# Altium PCB EDP_PCB.PcbDoc
Units mil, origin at the board's own origin, x right, y up, seen from the top; angles counter-clockwise.
Board outline 2905 x 1425 mil, 2 copper layers (Top Layer, Bottom Layer); 16 components, 12 nets, 93 pads, 13 vias.
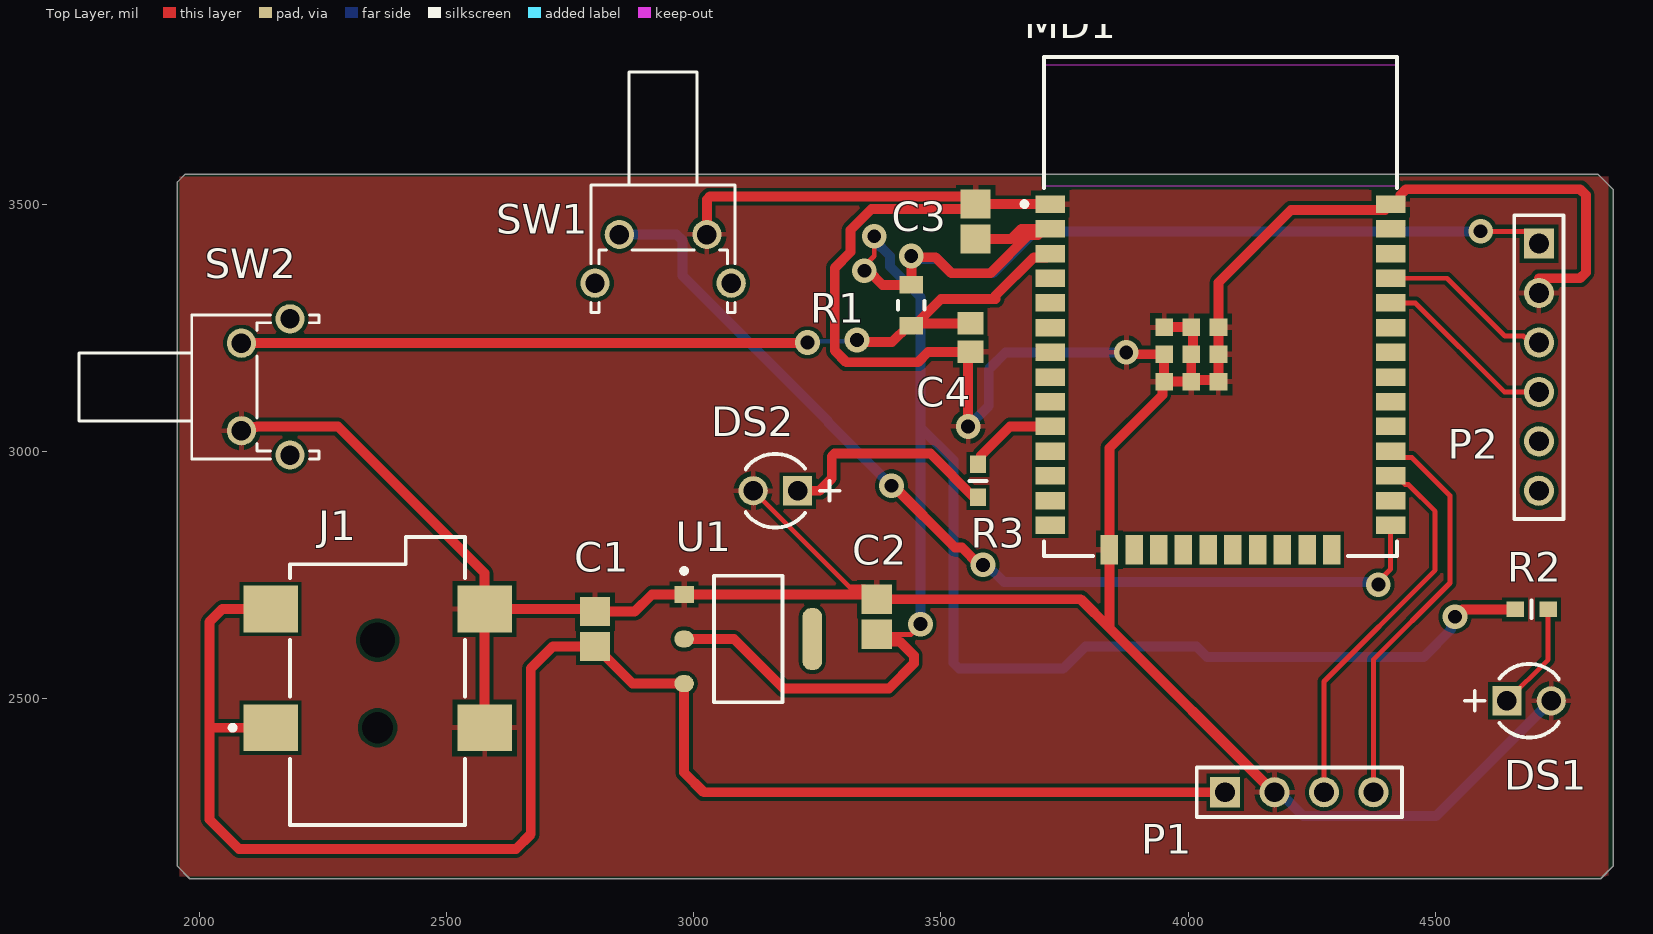
[diagram p0: Top Layer view]
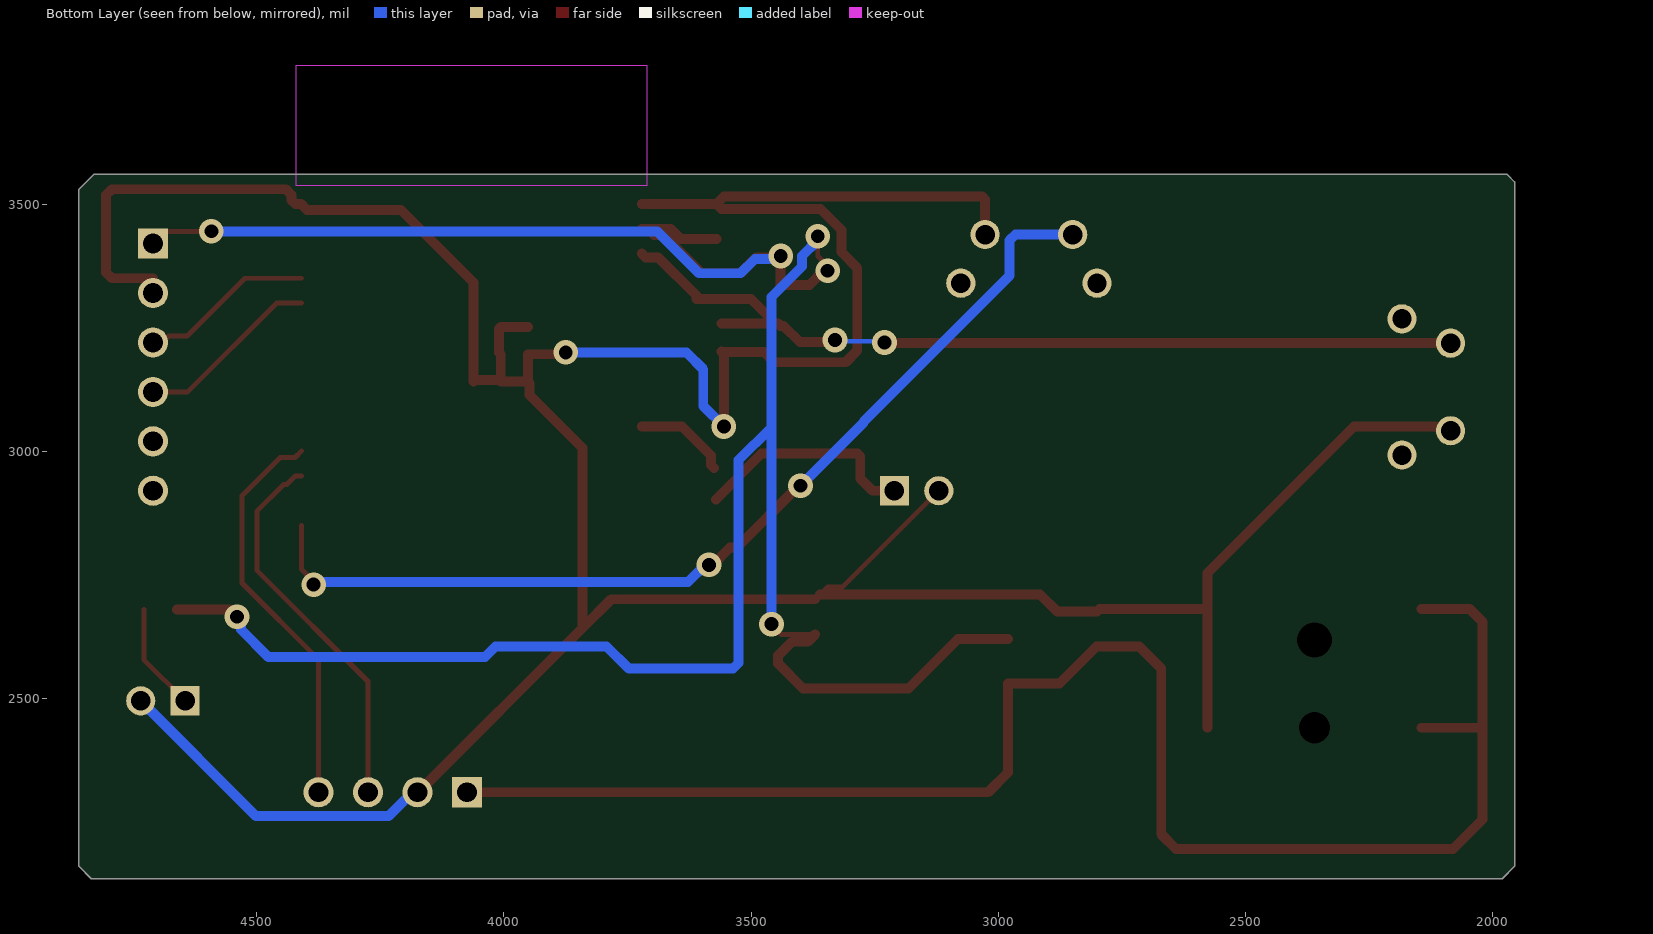
[diagram p1: Bottom Layer view, seen from below]
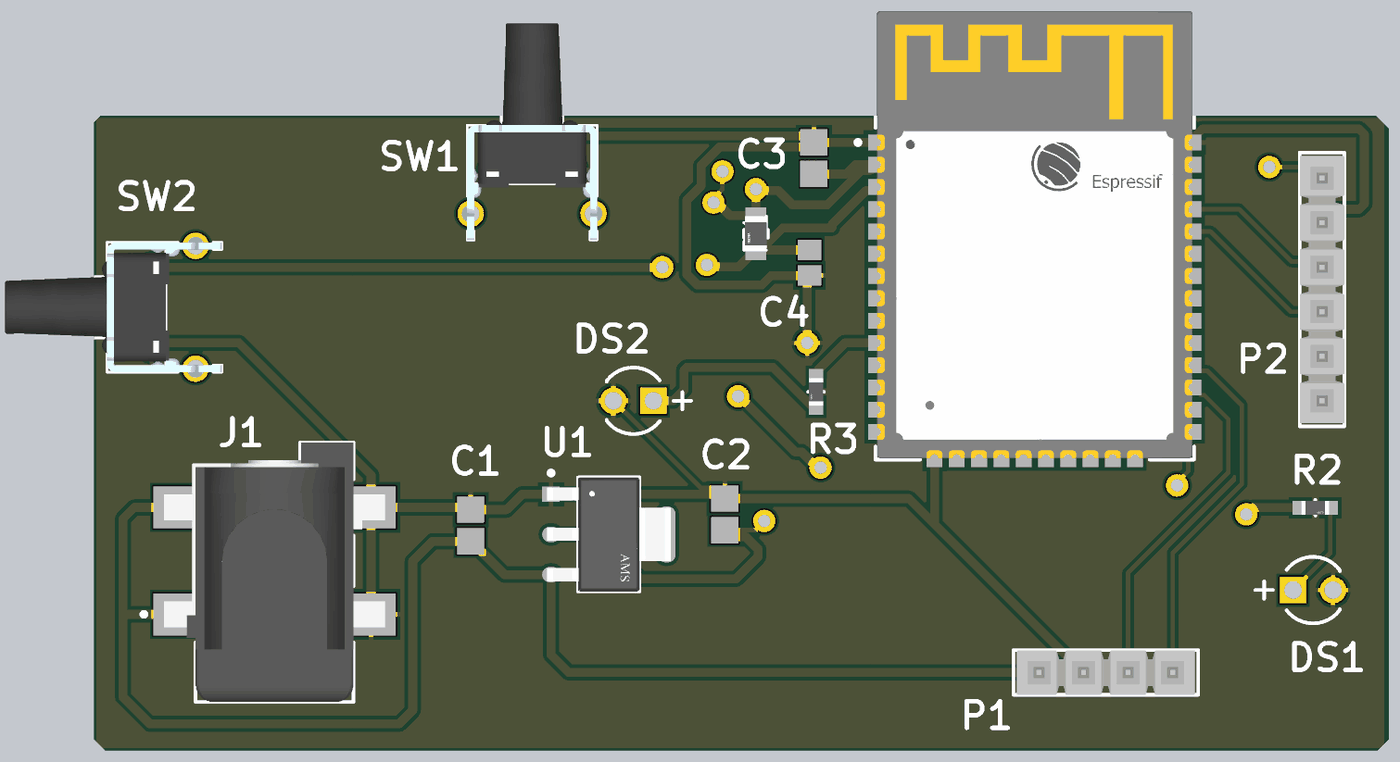
[diagram p2: 3D render of the assembled board from above, using the file's embedded part models]

## Layer stack, top to bottom
Top Solder: solder mask 0.4, Solder Resist, Dk 3.5
Top Layer: signal copper 1.4
Dielectric 1: dielectric 12.6, FR-4, Dk 4.8
Bottom Layer: signal copper 1.4
Bottom Solder: solder mask 0.4, Solder Resist, Dk 3.5

## Board outline
1955,2160 1955,3545 1970,3560 4830,3560 4860,3530 4860,2160 4835,2135 1980,2135

## Design rules (kind name [scope] priority, off if disabled: settings)
Clearance [All] p1: gap=8 ignorepadtopadclearanceinfootprint=FALSE
MinimumSolderMaskSliver [All] p1: minsoldermaskwidth=2
PolygonConnect [All] p1: connectstyle=Relief reliefconductorwidth=10 reliefentries=4 polygonreliefangle="90 Angle" airgapwidth=10
RoutingVias [All] p1: holewidth=28 width=50 viastyle="Through Hole" minholewidth=28 minwidth=50 maxholewidth=28 maxwidth=50
SilkToSolderMaskClearance [IsPad] p1: minsilkscreentomaskgap=2 clearancetoexposedcopper=TRUE
SolderMaskExpansion [All] p1: expansion=4 istentingtop=FALSE
Width [All] p1: maxlimit=50 minlimit=10 preferedwidth=10
28 further rules are at their usual default settings.

## Components (designator, comment, footprint, x,y, rotation, side; value= is the part's Value field where it differs from the comment)
C1 "08056D106KAT4A" CAPC2013X140X50ML20T25 2800,2640 r270 top
C2 "08056D106KAT4A" CAPC2013X140X50ML20T25 3370,2665 r270 top
C3 "08055D104KAT2A" CAPC2013X140X50ML20T25 3570,3464.57 r270 top
C4 "08053C105MAT2A" CAPC2013X94X50LL20T25 3560,3230 r90 top
DS1 "304090041" LED-2P-2.28-3MM_A 4690,2495 r0 top
DS2 "304090041" LED-2P-2.28-3MM_A 3165,2920 r180 top
J1 "PJ-002AH-SMT-TR" CUI-PJ-002AH-4_V 2360,2535 r90 top
MD1 "ESP32-WROOM-32E (4MB)" FP-ESP32-WROOM-32E_4MB-MFG 4065.51,3292.91 r0 top
P1 "MTSW-104-07-F-S-170" SMTC-MTSW-104-07-X-S-170 4075,2310 r0 top
P2 "TSW-106-17-G-S-LL" SMTC-TSW-106-17-X-S-LL 4710,3420 r270 top
R1 "AT0805DRE0710KL" FP-AT0805-MFG 3440,3295 r270 top
R2 "AT0603FRE07330RL" FP-AT0603-MFG 4695,2680 r0 top
R3 "AT0603FRE07330RL" FP-AT0603-MFG 3575,2940 r270 top
SW1 "431256083736" 4312560837x6 2937.8,3472.87 r180 top
SW2 "431256083736" 4312560837x6 2050,3130 r270 top
U1 "AMS1117-3.3" FP-AMS1117-IPC_C 3110,2620 r0 top

## Footprints (in the part's own frame and the unit in brackets; to place one, negate y for a bottom-side part, rotate by r counter-clockwise, add the part's x,y. Pads: shape width x height; smd on the part's side, far side on the other; paste and mask are expansions set on the pad)
4312560837x6 [mm] "6x6mm right angle Tact Switch with ground terminal, THT version"
  round 1.5 hole 1: 1(-2.25,0.875) 2(2.25,0.875) G1(-3.5,3.375) G2(3.5,3.375)
  silkscreen extent -3.7,-7.48 3.7,4.87, body extent -4.2,-7.48 4.2,4.87, height 7.25
CAPC2013X94X50LL20T25 [mm] "Chip Capacitor, 2-Leads, Body 2.01x1.25mm, IPC High Density"
  rect 1.15x1.35 smd: 1(-0.725,0) 2(0.725,0)
  body extent -1.1,-0.72 1.1,0.72, height 0.94
CAPC2013X140X50ML20T25 [mm] "Chip Capacitor, 2-Leads, Body 2.00x1.25mm, IPC Low Density"
  rect 1.5x1.55 smd: 1(-0.9,0) 2(0.9,0)
  body extent -1.1,-0.72 1.1,0.72, height 1.4
CUI-PJ-002AH-4_V [mm] "SMD, 4-Leads, Body 14.8x9 mm, Pitch 6.1mm"
  rect 2.4x2.8 smd: 1(-2.4,5.5) 1(3.7,5.5) 2(-2.4,-5.5) 3(3.7,-5.5)
  round 0 hole 1.6: MH1(-2.4,0)
  round 0 hole 1.8: MH2(2.1,0)
  silkscreen extent -7.4,-4.5 7.4,7.57, body extent -7.4,-6.3 7.4,6.3, height 11.2
FP-AMS1117-IPC_C [mm]
  rect 1.004x0.872 smd paste+0 mask+0: 1(-3.295,2.29)
  rrect100% 1.004x0.872 smd paste+0 mask+0: 2(-3.295,0) 3(-3.295,-2.29)
  rrect87% 1.004x3.182 smd paste+0 mask+0: 4(3.295,0)
  silkscreen extent -3.42,-3.25 1.75,3.62, body extent -3.9,-3.35 3.9,3.35, height 0.25
FP-AT0603-MFG [mm]
  rect 0.9x0.8 smd paste+0 mask+0: 1(-0.85,0) 2(0.85,0)
  silkscreen extent 0,-0.45 0,0.45, body extent -1.4,-0.55 1.4,0.55, height 0.25
FP-AT0805-MFG [mm]
  rect 0.9x1.2 smd paste+0 mask+0: 1(-1.05,0) 2(1.05,0)
  silkscreen extent -0.23,-0.67 0.23,0.67, body extent -1.6,-0.77 1.6,0.77, height 0.25
FP-ESP32-WROOM-32E_4MB-MFG [mm]
  rect 1.5x0.9 smd paste+0 mask+0: 1(-8.75,5.26) 2(-8.75,3.99) 3(-8.75,2.72) 4(-8.75,1.45) 5(-8.75,0.18) 6(-8.75,-1.09) 7(-8.75,-2.36) 8(-8.75,-3.63) 9(-8.75,-4.9) 10(-8.75,-6.17) 11(-8.75,-7.44) 12(-8.75,-8.71) 13(-8.75,-9.98) 14(-8.75,-11.25) 25(8.75,-11.25) 26(8.75,-9.98) 27(8.75,-8.71) 28(8.75,-7.44) 29(8.75,-6.17) 30(8.75,-4.9) 31(8.75,-3.63) 32(8.75,-2.36) 33(8.75,-1.09) 34(8.75,0.18) 35(8.75,1.45) 36(8.75,2.72) 37(8.75,3.99) 38(8.75,5.26)
  rect 0.9x1.5 smd paste+0 mask+0: 15(-5.71,-12.5) 16(-4.44,-12.5) 17(-3.17,-12.5) 18(-1.9,-12.5) 19(-0.63,-12.5) 20(0.64,-12.5) 21(1.91,-12.5) 22(3.18,-12.5) 23(4.45,-12.5) 24(5.72,-12.5)
  rect 0.9x0.9 smd paste+0 mask+0: 39(-2.9,-3.86) 39(-2.9,-2.46) 39(-2.9,-1.06) 39(-1.5,-3.86) 39(-1.5,-2.46) 39(-1.5,-1.06) 39(-0.1,-3.86) 39(-0.1,-2.46) 39(-0.1,-1.06)
  Keep-Out Layer region: -9,6.205 9,6.205 9,12.395 -9,12.395
  Keep-Out Layer region: -9,6.205 9,6.205 9,12.395 -9,12.395
  silkscreen extent -10.2,-12.83 9.08,12.83, body extent -9.6,-13.35 9.6,12.93, height 0.25
LED-2P-2.28-3MM_A [mm] "LED, 2-Leads, Dia 3mm, Pitch 2.28mm"
  rect 1.5x1.5 hole 1: 1(-1.14,0)
  round 1.5 hole 1: 2(1.14,0)
  silkscreen extent -3.29,-1.9 1.52,1.9, body extent -1.9,-1.91 1.52,1.91, height 5.3
SMTC-MTSW-104-07-X-S-170 [mm] "Assembly .025\" [.64] SQ Post Terminal Strip, 1x4 Pins, Vertical, 2.54mm Pitch, Male"
  rect 1.55x1.55 hole 1.02: 1(0,0)
  round 1.55 hole 1.02: 2(2.54,0) 3(5.08,0) 4(7.62,0)
  silkscreen extent -1.46,-1.27 9.08,1.27, body extent -1.27,-1.27 8.89,1.27, height 6.86
SMTC-TSW-106-17-X-S-LL [mm] ".025 SQ Post Terminal Strip Assembly, 1x6 Pins, Vertical, 2.54mm Pitch, Male"
  rect 1.55x1.55 hole 1.02: 1(0,0)
  round 1.55 hole 1.02: 2(2.54,0) 3(5.08,0) 4(7.62,0) 5(10.16,0) 6(12.7,0)
  silkscreen extent -1.46,-1.27 14.16,1.27, body extent -1.27,-1.27 13.97,1.27, height 18.29

## Part data
C1 C2: library part CMP-2007-04644-1, capacitance=10uF, Manufacturer="AVX Interconnect / Elco", Part Number=08056D106KAT4A
C3: library part CMP-2007-04689-1, capacitance=0.1uF, Manufacturer="AVX Interconnect / Elco", Part Number=08055D104KAT2A
C4: library part CMP-2007-04238-1, capacitance=1uF, Manufacturer="AVX Interconnect / Elco", Part Number=08053C105MAT2A
DS1 DS2: library part CMP-007-00007-2, "Red LED, 80 mW, 30 mA, -25 to 85 degC, 2-Pin THD", Manufacturer="Shenzhen CGX", Package Description="2-Pin Through Hole Device, Dia 3 mm, Pitch 2.28 mm", Case/Package=304090041, Datasheet URL=http://datasheet.octopart.com/304090041-Chengguangxing-datasheet-62330656.pdf, Datasheet Version=Sep-14, Manufacturer URL=http://szcgx.com/, Mounting Technology=TH, Package Reference=304090041, RoHS Compliant=Unknown
J1: library part CMP-2000-06896-2, "DC Power Jack, Right Angle, -25 to 85 degC, 4-Pin 14.8 x 9 x 11 mm SMD, RoHS, Tape and Reel", Current Rating=5A, Flammability Rating=UL94V-0, Insulation Resistance=100MOhms, Manufacturer=CUIInc., Operating Temperature Range=-25Cto+85C, Package Description="4-Pin Surface Mount Device, Body 14.8 x 9 mm, Pitch 6.1 mm", Package Reference=PJ-002AH, Voltage Rating=24V, Brand=CUI, Connector Type=DCPowerJack, Contact Gender=Male, Contact Material=Brass, Contact Plating=Nickel, Datasheet URL=http://www.cui.com/product/resource/pj-002ah-smt.pdf, Datasheet Version="Rev. 1.03, 11/2012", Factory Pack Quantity=350, Housing Material=Polyamide(PA), Inside Contact Diameter=2mm, Manufacturer URL=http://www.cui.com/, Mounting Angle=Right, Mounting Style=SMD/SMT, Mounting Technology=SurfaceMount, Outside Contact Diameter=6.5mm, Packaging=Reel, PartNumber=PJ-002AH, Product=Jacks, Product Category=DCPowerConnectors, RoHS=True, Termination Style=SMD/SMT
MD1: library part CMP-194065-000026-1, "RX TXRX MOD WIFI TRACE ANT SMD"
P1: library part CMP-1024-00106-1, "Modified .025\" SQ Post Header, Through-hole, Vertical, -55 to 125 degC, 2.54 mm Pitch, 4-Pin, Male, RoHS", Manufacturer=Samtec, Temperature Range="-55 to 125 degC", ComponentLink1Description="Manufacturer URL", ComponentLink1URL=http://www.samtec.com, ComponentLink2Description=Datasheet, ComponentLink2URL=http://www.samtec.com/documents/webfiles/pdf/MTSW.PDF, ComponentLink3Description="Package Specification", ComponentLink3URL=http://www.samtec.com/documents/webfiles/cpdf/MTSW-XXX-XX-X-X-XXXX-XX-XXX-MKT1.pdf, DatasheetVersion=F-214, Mounting Technology=Through-hole, Orientation=Vertical, PackageDescription="Assembly .025\" [.64] SQ Post Terminal Strip", PackageReference=MTSW-104-07-X-S-170, PackageVersion="BI, 2/1987", PartNumber=MTSW-104-07-F-S-170, Pitch="2.54 mm", RoHS=True
P2: library part CMP-1024-00391-1, "0.025\" SQ Post Header, Through-hole, Vertical, -55 to 125 degC, 2.54 mm Pitch, 6-Pin, Male, RoHS", Manufacturer=Samtec, Temperature Range="-55 to 125 degC", ComponentLink1Description="Manufacturer URL", ComponentLink1URL=http://www.samtec.com, ComponentLink2Description=Datasheet, ComponentLink2URL=http://www.samtec.com/documents/webfiles/pdf/TSW_TH.PDF, ComponentLink3Description="Package Specification", ComponentLink3URL=http://www.samtec.com/documents/webfiles/cpdf/TSW-XXX-XX-XXX-X-XX-XXX-MKT.pdf, DatasheetVersion=F-214, Mounting Technology=Through-hole, Orientation=Vertical, PackageDescription=".025[0.64] SQ. Post Terminal Strip Assembly", PackageReference=TSW-106-17-X-S-LL, PackageVersion="DM, 8/1988", PartNumber=TSW-106-17-G-S-LL, Pitch="2.54 mm", RoHS=True
R1: library part CMP-03412-049031-1, "Thin Film Chip Resistors Automotive Grade 10kΩ 0.5% 50ppm/°C 0805", Case/Package=0805, Max Operating Temperature=155°C, Max Power Dissipation=125mW, Min Operating Temperature=-55°C, Ratings=AEC-Q200, Resistance=10kR, Resistor Type="Thin Film", Temperature Coefficient=50ppm/°C, Tolerance=0.5%, Features="Moisture Resistant", Height=0.024inch, Length=0.079inch, Number of Terminations=2, Packaging="Tape and Reel", RoHS Compliant=Yes, Series=AT, Width=0.049inch
R2 R3: library part CMP-03412-049869-1, "Thin Film Chip Resistors Automotive Grade 330Ω 1% 50ppm/°C 0603", RoHS Compliant=Yes
SW1 SW2: library part CMP-1458-00012-4, "Tactile Switch, 0.05A, 12Vdc, 360Gf, Tht Rohs Compliant: Yes", Current Rating=50mA, Insulation Resistance=100MΩ, Max Operating Temperature=85°C, Min Operating Temperature=-40°C, Voltage Rating=12V, Actuator Material="Liquid Crystal Polymer, Polymer", Contact Plating=Silver, Diameter=3mm, Height=8.35mm, Illumination Type=Non-Illuminated, Mechanical Life=200kcycles, Packaging=Bulk, RoHS=Compliant, Switch Function=Off-Mom, Switch Travel=250µm, Termination="PC Pin", Throw Configuration=SPST
U1: library part CMP-209535-000001-1, "LDO Voltage Regulators 1A, 3.3V", Dropout Voltage=1.1V, Manufacturer="Advanced Monolithic Systems", Max Junction Temp=+125°C, Max Power Dissipation=1.2W, Max Supply Voltage=15V, Nominal Supply Current=5mA, Output Current=1A, Output Voltage=3.3V, Package=AMS1117, Temperature="-40°C to +125°C", Temperature Range Low=-40°C, Automotive=No, Category=IC, ComponentLink2Description=Datasheet, ComponentLink2URL=http://www.advanced-monolithic.com/pdf/ds1117.pdf, Device Class L1="Integrated Circuits (ICs)", Device Class L2="Power Management ICs", Device Class L3="Voltage Regulators - Linear", Height=1.8mm, Ipc Land Pattern Name=SOT229P700X180-4, Lead Free=Yes, Manufacturer Part Number=AMS1117-3.3, Number Of Outputs=1, Octopart=https://octopart.com/ams1117-3.3-advanced+monolithic+systems-25899300, Output Type=Fixed, RoHS=TRUE, Standoff Height=0.64mm, Temperature Range High=+125°C

## Via types
v1: diameter 50, hole 28, Top Layer to Bottom Layer, 13 vias

## Nets (pads, with @x,y where several pads share a name; then routed paths per layer and width w, separated by ;. In a path a pad name is that pad's centre, name@x,y a point inside that pad or via, vN(x,y) a via of type N, cw(c..) or ccw(c..) an arc to the next point about the centre after c; other vN are vias at no path point)
3.3: C2.2 C3.2 MD1.2 P2.1 R1.1 R2.1 U1.2 | length 5337.5
  Top Layer w10: v1(3345,3365) 3345,3375 3365,3395 v1(3365,3435) ; C2.2 3439.57,2629.57 3460,2650 3458.84,2650 v1(3458.73,2650.11) ; v1(4591.93,3444.93) 4685.07,3444.93 P2.1
  Top Layer w20: U1.2 3081.18,2620 3181.18,2520 3394.97,2520 3445.07,2570.09 3445.07,2586.66 3417.31,2614.41 3385.15,2614.41 C2.2 ; v1(3345,3365) 3353.12,3365 3381.78,3336.34 R1.1 v1(3440,3395) 3442.65,3392.35 3489.22,3392.35 3521.57,3360 3600,3360 3677.28,3437.28 3696.5,3437.28 MD1.2@3709.21,3450 ; C3.2 3641.93,3429.13 3662.8,3450 MD1.2@3709.21,3450 ; MD1.2 MD1.2@3709.21,3450 ; v1(4540,2665) 4555,2680 R2.1
  Bottom Layer w20: v1(3365,3435) 3365,3426.88 3397,3394.88 3397,3373.81 3458.73,3312.08 3458.73,3048.21 ; v1(3440,3395) 3445.74,3389.26 3492.31,3389.26 3521.57,3360 3605,3360 3689.93,3444.93 v1(4591.93,3444.93) ; v1(3458.73,2650.11) 3458.73,3048.21 ; v1(4540,2665) 4532.35,2657.35 4532.35,2639.21 4476.96,2583.82 4038.13,2583.82 4016.95,2605 3792.53,2605 3747.53,2560 3536.72,2560 3525,2571.72 3525,2981.93 3458.73,3048.21
+5: C1.2 J1.1 P1.1 U1.3 | length 3331
  Top Layer w20: J1.1@2143.46,2440.51 2020.51,2440.51 2020,2440 ; J1.1@2143.46,2680.67 2045.67,2680.67 2020,2655 2020,2440 ; P1.1 3020,2310 2980.28,2349.72 U1.3 2875.71,2529.84 2800.98,2604.57 C1.2 2714.57,2604.57 2670,2560 2670,2225 2640,2195 2080,2195 2020,2255 2020,2440
ESP_RX0: MD1.34 P2.4 | length 374.6
  Top Layer w10: MD1.34 4460,3300 4640,3120 P2.4
ESP_TX0: MD1.35 P2.3 | length 353.8
  Top Layer w10: MD1.35 4523.96,3350 4641.24,3232.72 4678.63,3232.72 4681.58,3229.76 4700.24,3229.76 P2.3
GND: C1.1 C2.1 C3.1 C4.1 DS1.2 DS2.2 J1.2 J1.3 MD1.1 MD1.15 MD1.38 MD1.39 P1.2 P2.2 SW1.1 SW2.2 U1.1 | length 8149.6
  Top Layer w10: DS2.2 3315.16,2724.96 3345.47,2724.96 3360.28,2710.16 C2.1
  Top Layer w20: SW2.2 2091.92,3048.89 2114.58,3048.89 2115.69,3050 2280,3050 2576.54,2753.46 J1.3 ; J1.2 J1.3 ; SW1.1 3026.38,3509.14 3032.24,3515 3555,3515 C3.1 ; C2.1@3360.28,2710.16 U1.1 2915.16,2710.16 2880.43,2675.43 C1.1 2794.76,2680.67 J1.3 ; C2.1 3782.88,2700.43 3840.79,2642.53 ; v1(3555,3050) 3555,3196.46 C4.1@3559.26,3200.72 ; C4.1 C4.1@3559.26,3200.72 ; MD1.1 C3.1 ; MD1.15 3840.71,3006.82 3947.98,3114.09 3947.98,3137.58 MD1.39@3951.34,3140.94 ; MD1.15@3840.79,2800.71 3840.79,2642.53 ; v1(3875,3200) 3885.82,3200 3881.89,3196.06 3951.34,3196.06 MD1.39@3951.34,3140.94 ; MD1.39@3951.34,3251.18 4006.46,3251.18 4009.98,3247.66 4009.98,3199.58 4006.46,3196.06 4006.47,3153.66 MD1.39@4006.46,3140.94 ; P1.2 4173.32,2310 3840.79,2642.53 ; P2.2@4710,3350 4793.28,3350 4805,3361.72 4805,3518.28 4793.28,3530 4441.24,3530 4429.53,3518.28 4429.53,3507.72 4421.81,3500 MD1.38 4398.33,3488.33 4208.33,3488.33 4061.57,3341.57 4061.57,3251.18 4061.57,3196.06 4061.57,3140.94 4058.49,3144.03 4009.54,3144.03 MD1.39@4006.46,3140.94 ; C4.1@3559.26,3200.72 3473.93,3200.72 3453.21,3180 3308.43,3180 3285,3203.43 3285,3370.94 3317,3402.94 3317,3447.81 3359.19,3490 3560,3490 C3.1 ; MD1.39@3951.34,3140.94 MD1.39@4006.46,3140.94
  Bottom Layer w20: v1(3555,3050) 3596.76,3091.76 3596.76,3165.9 3630.86,3200 v1(3875,3200) ; P1.2 4185,2310 4233.51,2261.49 4501.37,2261.49 DS1.2
NetC4_2: C4.2 MD1.3 R1.2 SW2.1 | length 1828.6
  Top Layer w20: SW2.1 2085.16,3219.29 3229.29,3219.29 v1(3230,3220) ; v1(3330,3225) 3334.28,3220.72 3401.15,3220.72 3434.09,3253.66 R1.2 3444.88,3258.54 R1.2@3450.79,3258.54 ; C4.2 R1.2@3450.79,3258.54 ; MD1.3 3713.31,3392.28 3687.78,3392.28 3610.7,3315.21 3610.7,3308.14 3500.38,3308.14 R1.2@3450.79,3258.54
  Bottom Layer w10: v1(3230,3220) 3232.5,3222.5 3327.5,3222.5 v1(3330,3225)
NetDS1_1: DS1.1 R2.2 | length 219.5
  Top Layer w10: DS1.1 4728.46,2578.35 R2.2
NetDS2_1: DS2.1 R3.2 | length 456.6
  Top Layer w20: DS2.1 3254.41,2920 3278.92,2944.51 3278.92,2989.14 3284.78,2995 3478.5,2995 R3.2@3570.98,2902.52
NetMD1_10: MD1.10 R3.1 | length 192.1
  Top Layer w20: R3.1@3575,2966.07 3580.75,2971.82 3580.75,2991.18 3639.57,3050 MD1.10
NetMD1_25: MD1.25 SW1.2 | length 2002.7
  Top Layer w10: v1(4385,2730) 4385,2736.57 4410,2761.57 MD1.25
  Top Layer w20: v1(3400,2930) 3403.46,2930 3528.27,2805.19 3542.41,2805.19 3577.6,2770 v1(3585,2770)
  Bottom Layer w20: SW1.2 2965.13,3438.43 2976.85,3426.71 2976.85,3355.06 3271.93,3059.98 3271.93,3058.07 v1(3400,2930) ; v1(3585,2770) 3592.78,2770 3627.78,2735 4380,2735 v1(4385,2730)
RADAR_RX: MD1.28 P1.4 | length 821.5
  Top Layer w10: P1.4 4375,2578.25 4530,2733.25 4530,2910 4452.72,2987.28 4422.72,2987.28 MD1.28
RADAR_TX: MD1.27 P1.3 | length 781.3
  Top Layer w10: P1.3 4275,2534.1 4500,2759.1 4500,2878.46 4445.74,2932.72 4439.09,2932.72 4421.81,2950 MD1.27
pads on no net: J1.MH1 J1.MH2 MD1.4 MD1.5 MD1.6 MD1.7 MD1.8 MD1.9 MD1.11 MD1.12 MD1.13 MD1.14 MD1.16 MD1.17 MD1.18 MD1.19 MD1.20 MD1.21 MD1.22 MD1.23 MD1.24 MD1.26 MD1.29 MD1.30 MD1.31 MD1.32 MD1.33 MD1.36 MD1.37 P2.5 P2.6 SW1.G1 SW1.G2 SW2.G1 SW2.G2 U1.4

## Polygon pours and split planes (outlines as drawn)
GND on Top Layer "GND_L01_P000" (solid, remove dead copper, pour order 0): 1960,3555 4850,3555 4850,2135 4845,2140 1960,2140

## Silkscreen, mask and mechanical layers (free items; w line width, h text height)
Mechanical 1:
  lines w10: 1955,2160 1980,2135 4835,2135 4860,2160 4860,3530 4830,3560 2005,3560 1970,3560 1955,3545 1955,2160